# Altium PCB COMECA-PCBv1.PcbDoc
Units mm, origin at the board's own origin, x right, y up, seen from the top; angles counter-clockwise.
Board outline 140 x 140 mm, 2 copper layers (Top Layer, Bottom Layer); 115 components, 87 nets, 444 pads, 10 vias.
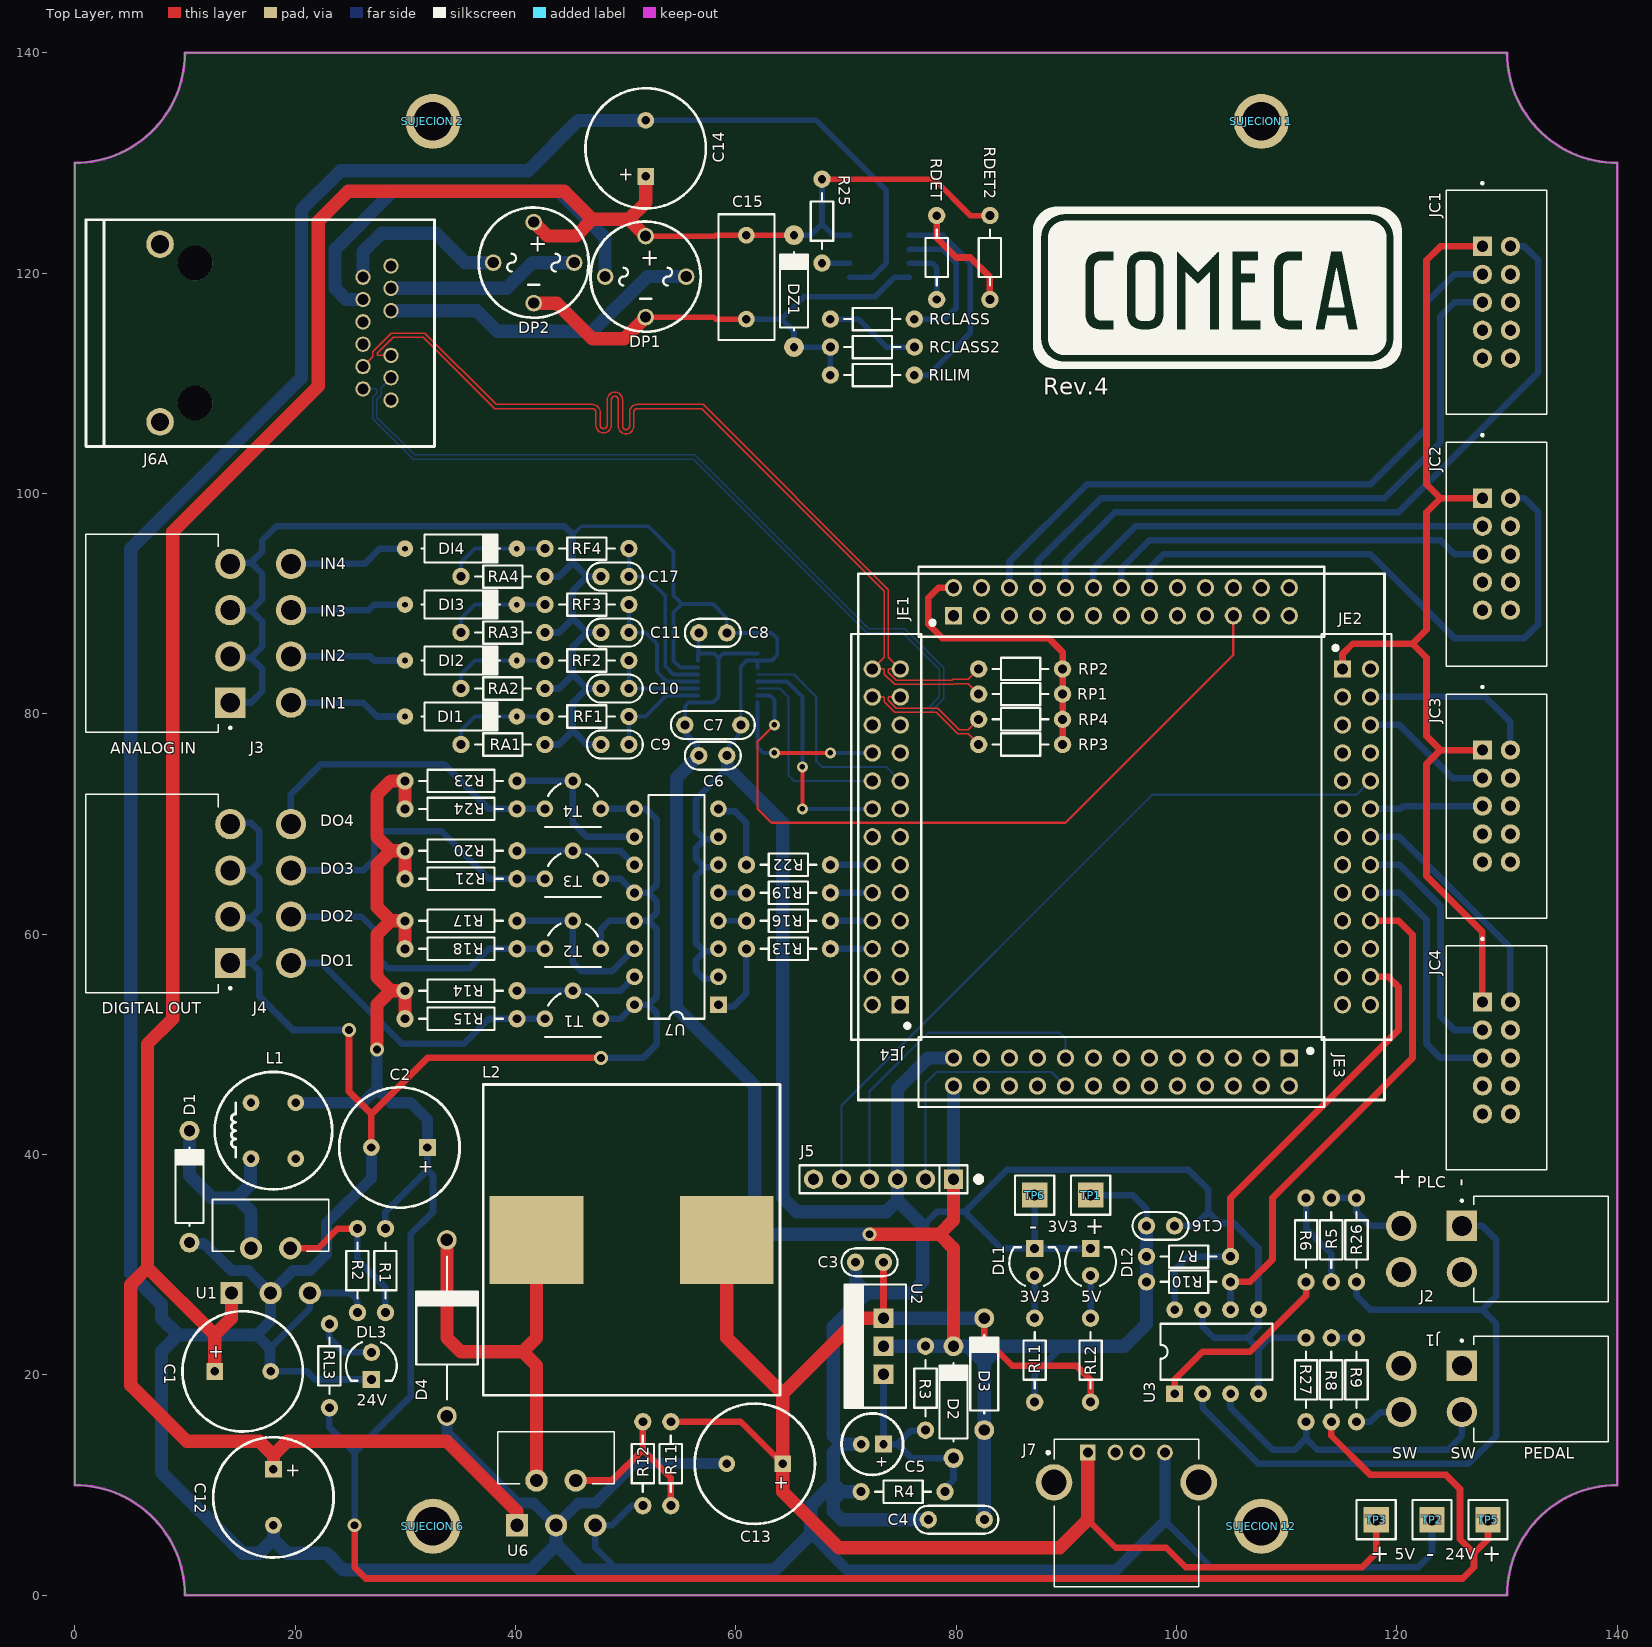
[diagram p0: Top Layer view]
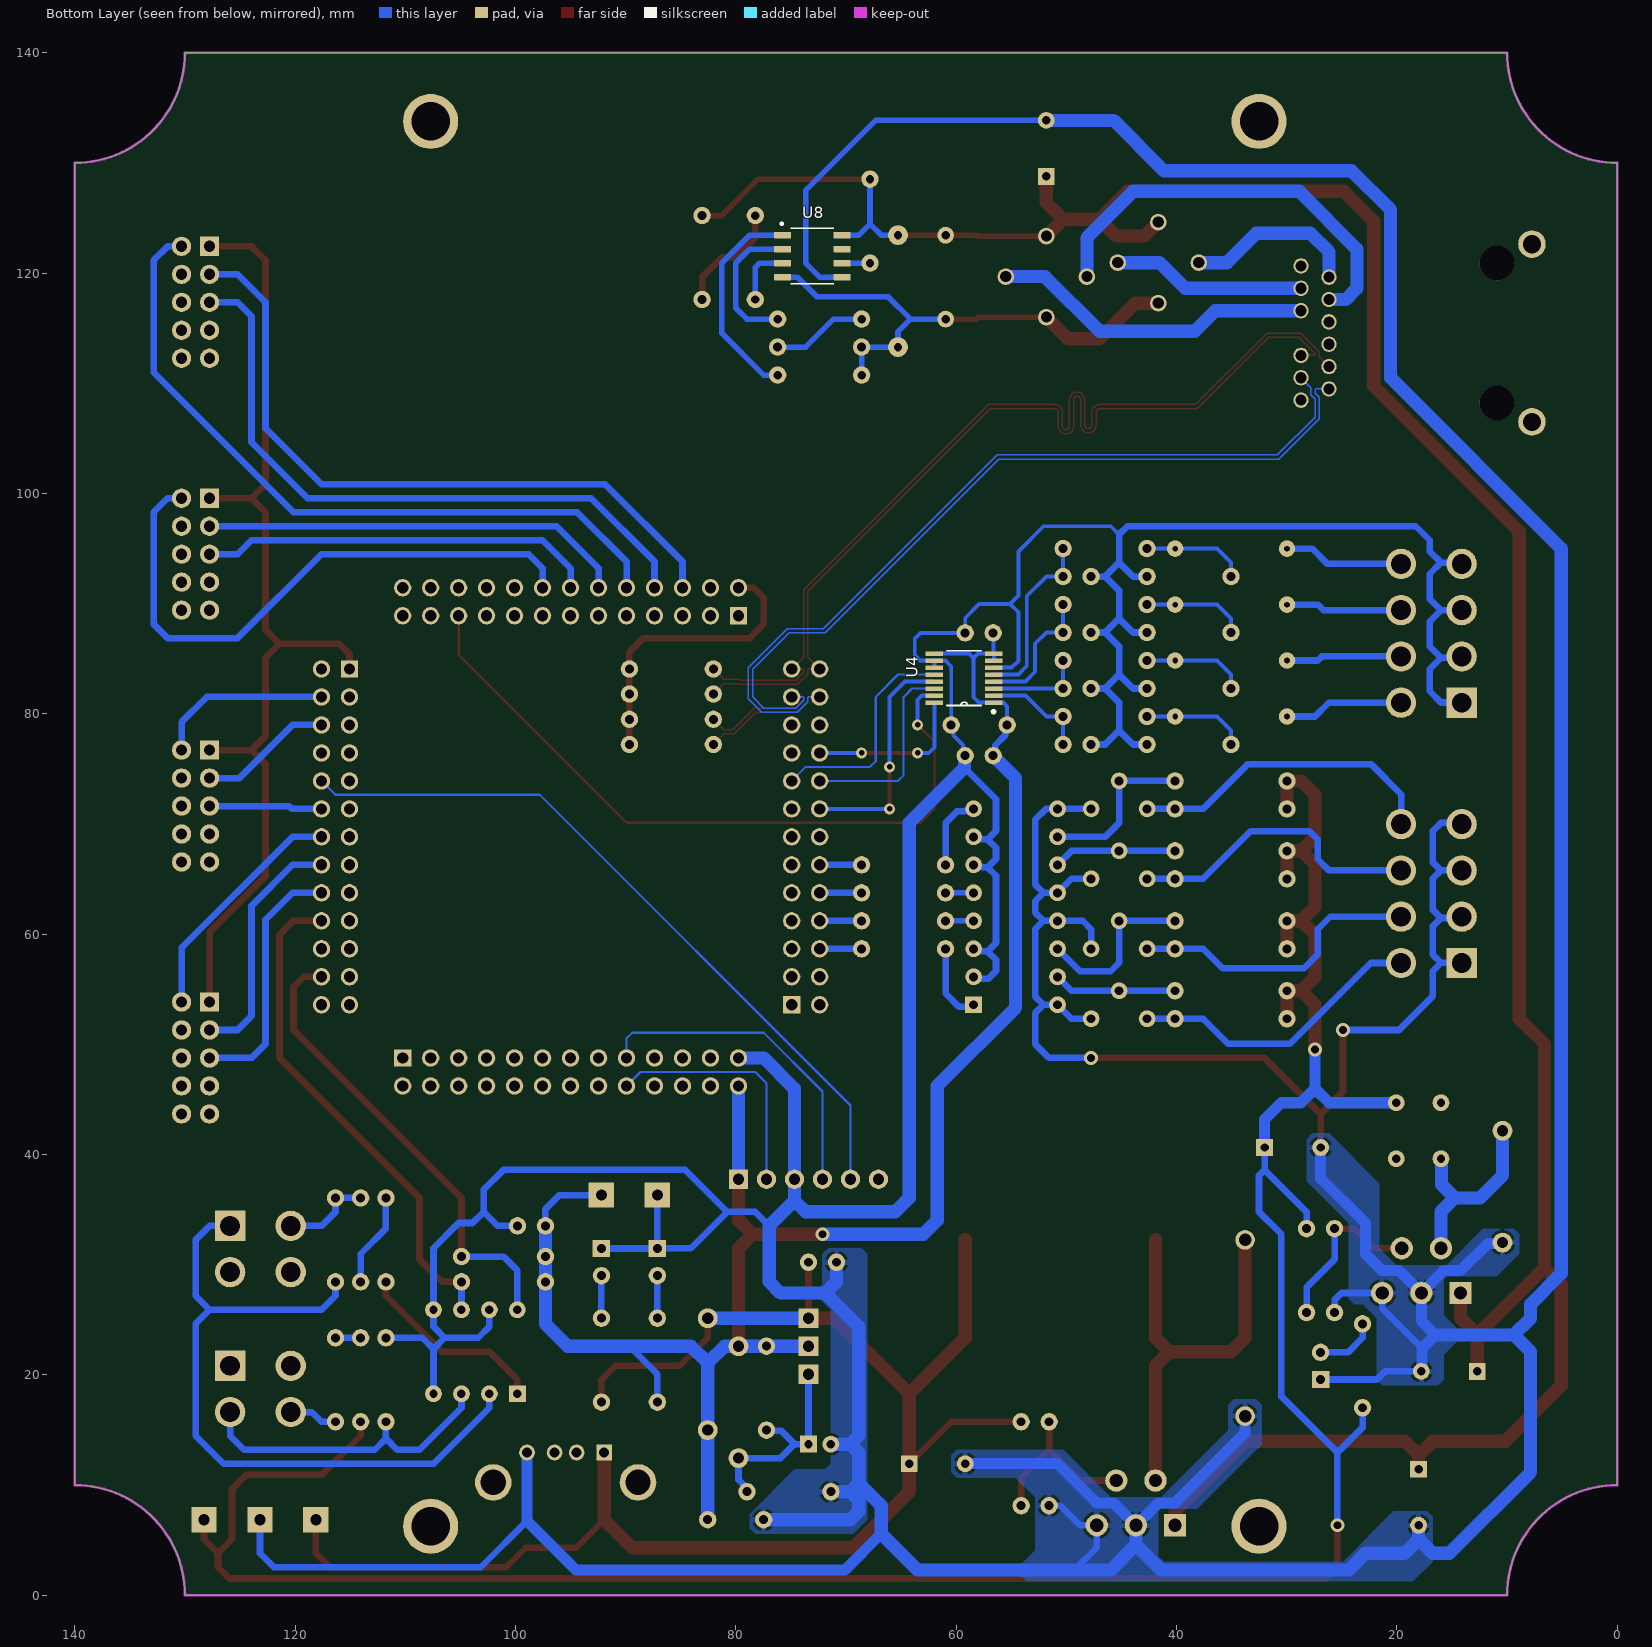
[diagram p1: Bottom Layer view, seen from below]

## Layer stack, top to bottom
Top Solder: solder mask 0.0102, Solder Resist, Dk 3.5
Top Layer: signal copper 0.0356
Dielectric 1: dielectric 0.32, FR-4, Dk 4.8
Bottom Layer: signal copper 0.0356
Bottom Solder: solder mask 0.0102, Solder Resist, Dk 3.5

## Board outline
0,10 0,130 ccw(c0,140) 10,140 130,140 ccw(c140,140) 140,130 140,10 ccw(c140,0) 130,0 10,0 ccw(c0,0)

## Design rules (kind name [scope] priority, off if disabled: settings)
BoardOutlineClearance [All] p1: gap=0.2 ignorepadtopadclearanceinfootprint=FALSE except(0.4: Arc-SplitBarrior Arc-SplitContinuation Track-SplitBarrior Track-SplitContinuation SMDPad-SplitBarrior SMDPad-SplitContinuation THPad-SplitBarrior THPad-SplitContinuation Via-SplitBarrior Via-SplitContinuation Fill-SplitBarrior Fill-SplitContinuation Poly-SplitBarrior Poly-SplitContinuation Region-SplitBarrior Region-SplitContinuation Text-SplitBarrior Text-SplitContinuation)
Clearance Clearance_Poly [InPolygon] p1: gap=0.254 ignorepadtopadclearanceinfootprint=FALSE
Clearance "Clearance Bottom Layer" [OnLayer('Bottom Layer')] p2: gap=0.203 ignorepadtopadclearanceinfootprint=TRUE except(0.254: Arc-Text Track-Text SMDPad-Text THPad-Text Via-Text Fill-Text Poly-Text Region-Text Text-Text)
Clearance "Clearance Top Layer" [OnLayer('Top Layer')] p3: gap=0.203 ignorepadtopadclearanceinfootprint=TRUE except(0.254: Arc-Text Track-Text SMDPad-Text THPad-Text Via-Text Fill-Text Poly-Text Region-Text Text-Text)
Clearance [All] p4: gap=0.2 ignorepadtopadclearanceinfootprint=FALSE except(0.089: Arc-Arc Arc-Track Arc-SMDPad Track-Track Track-SMDPad SMDPad-SMDPad; 0.127: Arc-Via Track-Via SMDPad-Via THPad-Via Via-Via; 0.254: Arc-Text Track-Text SMDPad-Text THPad-Text Via-Text Fill-Text Poly-Text Region-Text Text-Text)
DiffPairsRouting [InDifferentialPairClass('ETH')] p1: maxlimit=0.254 minlimit=0.127 mostfreqgap=0.254 toplayer_minwidth=0.127 toplayer_maxwidth=0.381 toplayer_prefwidth=0.381 bottomlayer_minwidth=0.127 bottomlayer_maxwidth=0.381 bottomlayer_prefwidth=0.381 maxuncoupledlength=12.7
HoleSize [All] p1: absolutevalues=TRUE maxlimit=6.3 minlimit=0.2 maxpercent=80.000 minpercent=20.000
MinimumAnnularRing [All] p1: minimumring=0.13
MinimumSolderMaskSliver [All] p1: minsoldermaskwidth=0.1
PolygonConnect PolygonConnect_1 [All] p1: thpad.connectstyle=Relief thpad.reliefconductorwidth=0.508 thpad.reliefentries=4 thpad.polygonreliefangle="90 Angle" thpad.airgapwidth=0.254 smdpad.connectstyle=Relief smdpad.reliefconductorwidth=0.508 smdpad.reliefentries=4 smdpad.polygonreliefangle="90 Angle" smdpad.airgapwidth=0.254 via.connectstyle=Direct via.reliefconductorwidth=0.508 via.reliefentries=4 via.polygonreliefangle="90 Angle" via.airgapwidth=0.254
RoutingCorners [All] p1: cornerstyle=Round minsetback=2.54 maxsetback=2.54
RoutingVias [All] p1: holewidth=0.5 width=1 viastyle="Through Hole" minholewidth=0.3 minwidth=0.5 maxholewidth=1 maxwidth=2
SilkToSilkClearance [All] p1: silktosilkclearance=0.1
SilkToSolderMaskClearance [IsPad] p1: minsilkscreentomaskgap=0.1 clearancetoexposedcopper=TRUE
SolderMaskExpansion [All] p1: expansion=0.102 istentingtop=FALSE
Width [All] p1: maxlimit=2.54 minlimit=0.127 preferedwidth=0.381
24 further rules are at their usual default settings.

## Classes and differential pairs
differential pair class ETH: RX TX
component class COMECA_Main: "SUJECION 1" "SUJECION 2" "SUJECION 6" "SUJECION 12"
component class U_UnidadDeControl-STM: J5 JE1 JE2 JE3 JE4
component class U_SalidasDigitales: J4 R13 R14 R15 R16 R17 R18 R19 R20 R21 R22 R23 R24 T1 T2 T3 T4 U7
component class U_Fuente24VDC: C1 C2 D1 DL3 L1 R1 R2 RL3 TP5 TP6 U1
component class U_Fuente5VDC: C12 C13 D4 DL2 J7 L2 R11 R12 RL2 TP3 U6
component class U_Fuente3.3VDC: C3 C4 C5 D2 D3 DL1 R3 R4 RL1 TP1 TP2 U2
component class U_EntradasAnalogicas: C6 C7 C8 C9 C10 C11 C17 DI1 DI2 DI3 DI4 J3 RA1 RA2 RA3 RA4 RF1 RF2 RF3 RF4 U4
component class U_ControladorPOE: C14 C15 DP1 DP2 DZ1 J6A R25 RCLASS RCLASS2 RDET RDET2 RILIM RP1 RP2 RP3 RP4 U8
component class U_ComandosExt: C16 J1 J2 R5 R6 R7 R8 R9 R10 R26 R27 U3
component class U_Calibres: JC1 JC2 JC3 JC4
differential pair TX: +TX_P -TX_N
differential pair RX: +RX_P -RX_N

## Components (designator, comment, footprint, x,y, rotation, side; value= is the part's Value field where it differs from the comment)
C1 "100uFx100V" CAP200RP 15.24,20.32 r0 top
C2 "220uFx50V" CAP200RP 29.464,40.64 r180 top
C3 "0.1uF" CAP100 72.136,30.226 r180 top
C4 "1uF" CAP200 80.01,6.858 r180 top
C5 "10uFx25V" CAP100RP 72.39,13.716 r180 top
C6 "0.1uF" CAP100 57.912,76.2 r0 top
C7 "1uF" CAP200 57.912,78.994 r0 top
C8 "0.1uF" CAP100 57.912,87.351 r0 top
C9 "0.1uF" CAP100 49.022,77.216 r180 top
C10 "0.1uF" CAP100 49.022,82.296 r180 top
C11 "0.1uF" CAP100 49.022,87.376 r180 top
C12 "100uFx100V" CAP200RP 18.034,8.89 r270 top
C13 "680uFx25V" CAP200RP 61.722,11.938 r180 top
C14 "100uFx100V" CAP200RP 51.816,131.318 r90 top
C15 "0.1uFx100V" CAP300v2 60.96,123.444 r270 top
C16 "0.1uF" CAP100 98.552,33.528 r0 top
C17 "0.1uF" CAP100 49.022,92.456 r180 top
D1 "MUR110" DO41#1 10.414,37.084 r90 top
D2 "1N4007" DO41#1 79.756,17.526 r90 top
D3 "1N4007" DO41#1 82.55,20.066 r90 top
D4 "MUR410" DO41-EXT 33.782,24.257 r90 top
DI1 "1N4148" DO41#2 35.052,79.756 r0 top
DI2 "1N4148" DO41#2 35.052,84.836 r0 top
DI3 "1N4148" DO41#2 35.052,89.916 r0 top
DI4 "1N4148" DO41#2 35.052,94.996 r0 top
DL1 "3V3" LED3 87.122,30.226 r90 top
DL2 "5V" LED3 92.202,30.226 r90 top
DL3 "24V" LED3 26.924,20.828 r270 top
DP1 "W10M" "PUENTE - W10M" 51.816,123.356 r0 top
DP2 "W10M" "PUENTE - W10M" 41.656,124.626 r0 top
DZ1 "1N4758" DO41#3 65.278,118.364 r90 top
J1 "PEDAL" TE_1586863-4 125.896,20.828 r90 top locked
J2 "PLC" TE_1586863-4 125.896,33.528 r90 top locked
J3 "ANALOG IN" TE_1586863-8 14.122,81.008 r270 top locked
J4 "DIGITAL OUT" TE_1586863-8 14.122,57.386 r270 top locked
J5 "PROGRAMMER" SIP6 79.756,37.758 r180 top
J6A "RJ45" ARJP11C-MB 10.922,114.56 r270 top locked
J7 "USB-TYPE-A" TE_6364372-2 95.448,10.244 r0 top locked
JC1 "CAL_1" "TE_5104338-1 - 90DEG" 127.762,122.428 r90 top locked
JC2 "CAL_2" "TE_5104338-1 - 90DEG" 127.762,99.568 r90 top locked
JC3 "CAL_3" "TE_5104338-1 - 90DEG" 127.762,76.708 r90 top locked
JC4 "CAL_4" "TE_5104338-1 - 90DEG" 127.762,53.848 r90 top locked
JE1 "SIP13" "SIP13*2 - HDR" 79.756,88.9 r0 top locked
JE2 "SIP13" "SIP13*2 - HDR" 115.062,84.074 r270 top locked
JE3 "SIP13" "SIP13*2 - HDR" 110.236,48.768 r180 top locked
JE4 "SIP13" "SIP13*2 - HDR" 74.93,53.594 r90 top locked
L1 "2200uH" CHOKE10.5 18.034,42.164 r90 top
L2 "220uH" CHOKE_PAD 50.546,32.258 r90 top
R1 "24K" RES300#1 28.194,25.654 r90 top
R2 "1K3" RES300#1 25.654,25.654 r90 top
R3 "240" RES300#1 77.216,14.986 r90 top
R4 "390" RES300#1 71.374,9.398 r0 top
R5 "1K" RES300#1 114.046,36.068 r270 top
R6 "150" RES300#1 111.76,36.068 r270 top
R7 "680" RES300#1 104.902,30.734 r180 top
R8 "1K" RES300#1 114.046,15.748 r90 top
R9 "150" RES300#1 116.332,23.368 r270 top
R10 "680" RES300#1 104.902,28.448 r180 top
R11 "4K7" RES300#1 54.102,8.128 r90 top
R12 "1K5" RES300#1 51.562,8.128 r90 top
R13 "220" RES300#1 68.58,58.674 r180 top
R14 "4K7" RES400 40.132,54.864 r180 top
R15 "4K7" RES400 40.132,52.324 r180 top
R16 "220" RES300#1 68.58,61.214 r180 top
R17 "4K7" RES400 40.132,61.214 r180 top
R18 "4K7" RES400 40.132,58.674 r180 top
R19 "220" RES300#1 68.58,63.754 r180 top
R20 "4K7" RES400 40.132,67.564 r180 top
R21 "4K7" RES400 40.132,65.024 r180 top
R22 "220" RES300#1 68.58,66.294 r180 top
R23 "4K7" RES400 40.132,73.914 r180 top
R24 "4K7" RES400 40.132,71.374 r180 top
R25 "100K" RES300#2 67.818,120.904 r90 top
R26 "47K" RES300#1 116.332,28.448 r90 top
R27 "47K" RES300#1 111.76,23.368 r270 top
RA1 "150" RES300#1 42.672,77.216 r180 top
RA2 "150" RES300#1 42.672,82.296 r180 top
RA3 "150" RES300#1 42.672,87.376 r180 top
RA4 "150" RES300#1 42.672,92.456 r180 top
RCLASS "4K3" RES300#2 68.58,115.824 r0 top
RCLASS2 "120" RES300#1 68.58,113.284 r0 top
RDET "24K" RES300#2 78.232,117.602 r90 top
RDET2 "910" RES300#1 83.058,117.602 r90 top
RF1 "3K3" RES300#1 42.672,79.756 r0 top
RF2 "3K3" RES300#1 42.672,84.836 r0 top
RF3 "3K3" RES300#1 42.672,89.916 r0 top
RF4 "3K3" RES300#1 42.672,94.996 r0 top
RILIM "160K" RES300#2 68.58,110.744 r0 top
RL1 "330" RES300#1 87.122,25.146 r270 top
RL2 "680" RES300#1 92.202,25.146 r270 top
RL3 "4K7" RES300#1 23.114,24.638 r270 top
RP1 "50" RES300#1 82.042,81.788 r0 top
RP2 "50" RES300#1 82.042,84.074 r0 top
RP3 "50" RES300#1 82.042,77.216 r0 top
RP4 "50" RES300#1 82.042,79.502 r0 top
"SUJECION 1" "SUJECION" "SUJECION (5.00MM - 3.50MM)" 107.696,133.77 r90 top
"SUJECION 2" "SUJECION" "SUJECION (5.00MM - 3.50MM)" 32.512,133.77 r90 top
"SUJECION 6" "SUJECION" "SUJECION (5.00MM - 3.50MM)" 32.512,6.262 r90 top
"SUJECION 12" "SUJECION" "SUJECION (5.00MM - 3.50MM)" 107.696,6.262 r90 top
T1 "BC338" TO92 45.212,53.594 r180 top
T2 "BC338" TO92 45.212,59.944 r180 top
T3 "BC338" TO92 45.212,66.294 r180 top
T4 "BC338" TO92 45.212,72.644 r180 top
TP1 "3V3" "TPTH - PAD ONLY" 92.202,36.322 r0 top
TP2 "GND" "TPTH - PAD ONLY" 123.19,6.858 r0 top
TP3 "5VDC" "TPTH - PAD ONLY" 118.11,6.858 r0 top
TP5 "24VDC" "TPTH - PAD ONLY" 128.27,6.858 r0 top
TP6 "GND" "TPTH - PAD ONLY" 87.122,36.322 r0 top
U1 "LM2575HV-ADJ" TO220-5 17.78,27.432 r0 top
U2 "LM317" "TO-220 V" 73.406,22.606 r90 top
U3 "TLP521" DIP8 99.822,18.288 r90 top
U4 "ADS7841E/2K5" SOP63P600X175-16N 59.276,83.248 r0 bottom
U6 "LM2576HV-ADJ" TO220-5 43.688,6.35 r0 top
U7 "CNY74-4H" DIP16 58.42,53.594 r180 top
U8 "TPS2375D" SOIC127P599X175-8N 73.058,121.539 r180 bottom

## Footprints (in the part's own frame and the unit in brackets; to place one, negate y for a bottom-side part, rotate by r counter-clockwise, add the part's x,y. Pads: shape width x height; smd on the part's side, far side on the other; paste and mask are expansions set on the pad)
ARJP11C-MB [mm] "Magjack Conector for PoE"
  round 1.4 hole 1.016: 1(5.075,15.24) 2(3.045,15.24) 3(1.015,15.24) 4(-1.015,15.24) 5(-3.045,15.24) 6(-5.075,15.24) 7(6.09,17.78) 8(4.06,17.78) 9(2.03,17.78) 10(-2.03,17.78) 11(-4.06,17.78) 12(-6.09,17.78)
  round 3.15 hole 3.175: PAD(-6.35,0) PAD(6.35,0)
  round 2.5 hole 1.651: SHIELD(-8.065,-3.18) SHIELD(8.065,-3.18)
  silkscreen extent -10.29,-9.91 10.29,21.72, body extent -10.33,-10.9 10.33,21.7, height 15.92
CAP100 [mil]
  round 62 hole 32: 1(-50,0) 2(50,0)
  silkscreen extent -100,-50 100,50, body extent -115,-33 115,34, height 241
CAP100RP [mil] "Body diameter 5mm"
  rect 60x60 hole 30: 1(-40,0)
  round 60 hole 30: 2(40,0)
  silkscreen extent -110,-110 110,110, body extent -99,-99 99,100, height 454
CAP200 [mil]
  round 62 hole 32: 1(-100,0) 2(100,0)
  silkscreen extent -150,-50 150,50, body extent -110,-46 110,44, height 246
CAP200RP [mil] "Body Diameter 10.33mm"
  rect 60x60 hole 30: 1(-100,0)
  round 60 hole 30: 2(100,0)
  silkscreen extent -215,-215 215,215, body extent -197,-197 197,197, height 787
CAP300v2 [mil]
  round 60 hole 30: 1(0,0) 2(300,0)
  silkscreen extent -75,-100 375,100, body extent -75,-100 375,100, height 220
CHOKE10.5 [mil] "Choke Inductor 10.5mm"
  round 60 hole 30: 1(-100,80) 2(100,-80) NC(-100,-80) NC(100,80)
  silkscreen extent -210,-210 210,210, body extent -213,-213 213,213, height 709
CHOKE_PAD [mm] "Choke Inductor SMD"
  rect 8x8.5 smd: 1(0,8.636) 2(0,-8.636)
  silkscreen extent -14.1,-13.46 14.1,13.46, body extent -13.65,-11.55 13.65,11.55, height 20
DIP8 [mil]
  rect 60x60 hole 30: 1(0,0)
  round 60 hole 30: 2(0,-100) 3(0,-200) 4(0,-300) 5(300,-300) 6(300,-200) 7(300,-100) 8(300,0)
  silkscreen extent 50,-350 250,50, body extent -3,-363 303,63, height 177
DIP16 [mil]
  rect 60x60 hole 32: 1(0,0)
  round 60 hole 32: 2(0,-100) 3(0,-200) 4(0,-300) 5(0,-400) 6(0,-500) 7(0,-600) 8(0,-700) 9(300,-700) 10(300,-600) 11(300,-500) 12(300,-400) 13(300,-300) 14(300,-200) 15(300,-100) 16(300,0)
  silkscreen extent 50,-750 250,50, body extent -3,-744 307,44, height 78
DO41#1 [mm]
  round 1.8 hole 1.016: 1(-5.08,0) 2(5.08,0)
  silkscreen extent -3.56,-1.27 3.56,1.27, body extent -5.46,-1.19 5.46,1.37, height 2.03
DO41#2 [mm]
  round 1.5 hole 0.508: 1(-5.08,0) 2(5.08,0)
  silkscreen extent -3.56,-1.27 3.56,1.27, body extent -5.46,-1.19 5.46,1.37, height 2.03
DO41#3 [mm]
  round 1.8 hole 0.762: 1(-5.08,0) 2(5.08,0)
  silkscreen extent -3.56,-1.27 3.56,1.27, body extent -5.46,-1.19 5.46,1.37, height 2.03
DO41-EXT [mil]
  round 70 hole 45: 1(-315,0) 2(315,0)
  silkscreen extent -255,-110 255,110, body extent -332,-110 332,110, height 220
LED3 [mil]
  round 62 hole 32: 1(-48,0)
  rect 62x62 hole 32: 2(49,0)
  silkscreen extent -84,-90 54,90, body extent -65,-64 65,65, height 19
"PUENTE - W10M" [mm]
  round 1.5 hole 1.016: 1(0,0) 2(-3.677,-3.677) 3(0,-7.354) 4(3.677,-3.677)
  silkscreen extent -5,-8.68 5,1.32, body extent -4.82,-8.58 4.99,1.22, height 4.6
RES300#1 [mil]
  round 62 hole 32: 1(0,0) 2(300,0)
  silkscreen extent 50,-40 250,40, body extent -10,-38 310,38, height 79
RES300#2 [mil]
  round 62 hole 30: 1(0,0) 2(300,0)
  silkscreen extent 50,-40 250,40, body extent -10,-38 310,38, height 79
RES400 [mil]
  round 62 hole 32: 1(0,0) 2(400,0)
  silkscreen extent 50,-40 350,40, body extent -12,-45 412,46, height 96
SIP6 [mm]
  rect 1.75x1.75 hole 1.016: 1(0,0)
  round 1.75 hole 1.016: 2(2.54,0) 3(5.08,0) 4(7.62,0) 5(10.16,0) 6(12.7,0)
  silkscreen extent -1.27,-1.27 13.97,1.27, body extent -1.27,-1.3 13.97,1.24, height 8.38
"SIP13*2 - HDR" [mil]
  rect 62x62 hole 40: 1(0,0)
  round 62 hole 40: 2(0,100) 3(100,0) 4(100,100) 5(200,0) 6(200,100) 7(300,0) 8(300,100) 9(400,0) 10(400,100) 11(500,0) 12(500,100) 13(600,0) 14(600,100) 15(700,0) 16(700,100) 17(800,0) 18(800,100) 19(900,0) 20(900,100) 21(1000,0) 22(1000,100) 23(1100,0) 24(1100,100) 25(1200,0) 26(1200,100)
  silkscreen extent -125,-75 1325,175, body extent -60,-47 1260,148, height 335
SOIC127P599X175-8N [mm]
  rrect25% 1.55x0.6 smd mask+0.07: 1(-2.7,1.905) 2(-2.7,0.635) 3(-2.7,-0.635) 4(-2.7,-1.905) 5(2.7,-1.905) 6(2.7,-0.635) 7(2.7,0.635) 8(2.7,1.905)
  silkscreen extent -2.87,-2.52 1.95,3.04, body extent -3,-2.45 3,2.45, height 1.75
SOP63P600X175-16N [mm]
  rect 1.6x0.41 smd mask+0.05: 1(-2.7,2.222) 2(-2.7,1.587) 3(-2.7,0.952) 4(-2.7,0.317) 5(-2.7,-0.318) 6(-2.7,-0.953) 7(-2.7,-1.588) 8(-2.7,-2.223) 9(2.7,-2.223) 10(2.7,-1.588) 11(2.7,-0.953) 12(2.7,-0.318) 13(2.7,0.317) 14(2.7,0.952) 15(2.7,1.587) 16(2.7,2.222)
  silkscreen extent -2.79,-2.49 1.55,3.17, body extent -3,-2.45 3,2.45, height 1.75
"SUJECION (5.00MM - 3.50MM)" [mm]
  round 5 hole 3.5: 1(0,0)
TE_1586863-4 [mm]
  rect 2.75x2.75 hole 1.8: 1(0,0)
  round 2.75 hole 1.8: 2(0,5.5) 3(-4.2,0) 4(-4.2,5.5)
  silkscreen extent -6.9,-13.3 2.7,0.1, body extent -6.8,-14.13 3.3,6, height 11.25
TE_1586863-8 [mm]
  rect 2.75x2.75 hole 1.8: 1(0,0)
  round 2.75 hole 1.8: 2(0,5.5) 3(-4.2,0) 4(-4.2,5.5) 5(-8.4,0) 6(-8.4,5.5) 7(-12.6,0) 8(-12.6,5.5)
  silkscreen extent -15.3,-13.11 2.7,0.1, body extent -15.32,-14 3.18,6.13, height 11.25
"TE_5104338-1 - 90DEG" [mm]
  rect 1.75x1.75 hole 1.016: 1(0,0)
  round 1.75 hole 1.016: 2(0,-2.54) 3(-2.54,0) 4(-2.54,-2.54) 5(-5.08,0) 6(-5.08,-2.54) 7(-7.62,0) 8(-7.62,-2.54) 9(-10.16,0) 10(-10.16,-2.54)
  silkscreen extent -15.24,-5.84 5.83,3.3, body extent -15.24,-12.19 5.08,0.32, height 9.27
TE_6364372-2 [mm]
  rect 1.428x1.428 hole 0.92: 1(-3.5,2.71)
  round 1.428 hole 0.92: 2(-1,2.71) 3(1,2.71) 4(3.5,2.71)
  round 3.316 hole 2.3: SH1(-6.57,0) SH2(6.57,0)
  silkscreen extent -7.2,-9.48 6.57,3.94, body extent -7.26,-10.3 7.37,3.7, height 7.69
TO92 [mil]
  round 60 hole 32: 1(0,-50) 2(100,50) 3(-100,50)
  silkscreen extent -100,-39 100,115, body extent -110,-61 110,110, height 315
TO220-5 [mil]
  rect 79.5x79.5 hole 47.24: 1(-140,0)
  round 79.5 hole 47.24: 2(-70,160) 3(0,0) 4(70,160) 5(140,0)
  silkscreen extent -208,149 208,334, body extent -200,-6 200,327, height 824
"TO-220 V" [mil]
  rect 70x70 hole 40: 1(-100,0) 2(0,0) 3(100,0)
  silkscreen extent -220,-80 220,139, body extent -200,-58 200,107, height 900
"TPTH - PAD ONLY" [mm]
  rect 2.3x2.3 hole 1.016: 1(0,0)
  silkscreen extent -1.78,-1.78 1.78,1.78

## Part data
C1 C2 C5 C12 C13 C14: library part CAPPOL
C3 C4 C6 C7 C8 C9 C10 C11 C15 C16 C17: library part CAP
D1 D4: library part "DIODO SCHOTTKY"
D2 D3 DI1 DI2 DI3 DI4: library part DIODO
DL1 DL2 DL3: library part LED
DP1 DP2: "Bridge Rectifier TH 1000V 1.5A"
DZ1: library part "DIODO ZENER"
J1 J2: library part 1586863-4, "Conn Power HDR 4 POS 4.2mm Solder RA Thru-Hole 4 Terminal 1 Port Tray", Package=None, Availability=Unavailable, EU_RoHS_Compliance=Compliant, MF="TE Connectivity", MP=1586863-4, Price=None, SnapEDA_Link=https://www.snapeda.com/parts/1586863-4/TE%20Connectivity%20AMP%20Connectors/view-part/1401879/?ref=snap, TE_purchase_URL=https://www.te.com/usa-en/product-1586863-4.html?te_bu=Cor&te_type=disp&te_campaign=seda_glo_cor-seda-global-disp-prtnr-fy19-seda-model-bom-cta_sma-317_1&elqCampaignId=32493
J3 J4: library part 1586863-8, "Conn Power HDR 8 POS 4.2mm Solder RA Thru-Hole 8 Terminal 1 Port Tray", Package=None, Availability=Unavailable, EU_RoHS_Compliance=Compliant, MF="TE Connectivity", MP=1586863-8, Price=None, SnapEDA_Link=https://www.snapeda.com/parts/1586863-8/TE%20Connectivity%20AMP%20Connectors/view-part/1404500/?ref=snap, TE_purchase_URL=https://www.te.com/usa-en/product-1586863-8.html?te_bu=Cor&te_type=disp&te_campaign=seda_glo_cor-seda-global-disp-prtnr-fy19-seda-model-bom-cta_sma-317_1&elqCampaignId=32493
J5: library part CON6
J6A: library part ARJP11C-MBSC-L2, "Magjack Connector for PoE"
J7: library part 6364372-2, "Conn USB 2.0 Type A RCP 4 POS Solder RA Thru-Hole 4 Terminal 1 Port Box/Tube", Package=None, Digi-Key_Part_Number=A122647-ND, Digi-Key_Purchase_URL=https://www.digikey.com/product-detail/en/te-connectivity-amp-connectors/6364372-2/A122647-ND/2286712?utm_source=snapeda&utm_medium=aggregator&utm_campaign=symbol, EU_RoHS_Compliance=Compliant, MF="TE Connectivity", MP=6364372-2, SnapEDA_Link=https://www.snapeda.com/parts/6364372-2/TE%20Connectivity%20AMP%20Connectors/view-part/2053020/?ref=snap, TE_purchase_URL=https://www.te.com/usa-en/product-6364372-2.html?te_bu=Cor&te_type=disp&te_campaign=seda_glo_cor-seda-global-disp-prtnr-fy19-seda-model-bom-cta_sma-317_1&elqCampaignId=32493
JC1 JC2 JC3 JC4: library part 5104338-1, "HEADER; PIN; AMP-LATCH; 10 POS; 2.54 X 2.54; VERTICAL; LOW PROFILE; PCB", Package=None, Availability=Unavailable, MF="TE Connectivity", MP=5104338-1, Price=None, SnapEDA_Link=https://www.snapeda.com/parts/5104338-1/TE%20Connectivity%20AMP%20Connectors/view-part/2881080/?ref=snap, TE_purchase_URL=https://www.te.com/usa-en/product-5104338-1.html?te_bu=Cor&te_type=disp&te_campaign=seda_glo_cor-seda-global-disp-prtnr-fy19-seda-model-bom-cta_sma-317_1&elqCampaignId=32493
JE1 JE2 JE3 JE4: library part CON13*2
L1 L2: library part Choke
R1 R2 R3 R4 R5 R6 R7 R8 R9 R10 R11 R12 R13 R14 R15 R16 R17 R18 R19 R20 R21 R22 R23 R24 R25 R26 R27 RA1 RA2 RA3 RA4 RCLASS RCLASS2 RDET RDET2 RF1 RF2 RF3 RF4 RILIM RL1 RL2 RL3 RP1 RP2 RP3 RP4: library part RES
T1 T2 T3 T4: library part "TRANSISTOR NPN"
TP1 TP2 TP3 TP5 TP6: library part TP
U1 U6: library part LM257X, "Buck Switching Regulator IC Positive Output 1A TO-220-5 Formed Leads"
U2: "IC REG ADJ 1.5A 3 TERM TO-220"
U3: library part TLP521-2, "PhotoCoupler"
U4: "ANALOG-TO-DIGITAL CONVERTER", Package=None, Availability=Unavailable, MP=ADS7841E/2K5, Price=None
U8: "Class 3 PoE PD with latch protection 8-SOIC -40 to 85", Package="SOIC-8 Texas Instruments", Check_prices=https://www.snapeda.com/parts/TPS2375D/Texas%20Instruments/view-part/570877/?ref=eda, Digi-Key_Part_Number=296-26922-2-ND, MF="Texas Instruments", MP=TPS2375D, Purchase-URL=https://pricing.snapeda.com/search/part/TPS2375D/?ref=eda, SnapEDA_Link=https://www.snapeda.com/parts/TPS2375D/Texas%20Instruments/view-part/570877/?ref=snap

## Via types
v1: diameter 1.25, hole 0.711, Top Layer to Bottom Layer, tented both sides, 5 vias
v2: diameter 1.016, hole 0.508, Top Layer to Bottom Layer, tented both sides, 5 vias

## Nets (pads, with @x,y where several pads share a name; then routed paths per layer and width w, separated by ;. In a path a pad name is that pad's centre, name@x,y a point inside that pad or via, vN(x,y) a via of type N, cw(c..) or ccw(c..) an arc to the next point about the centre after c; other vN are vias at no path point)
3.3VDC: C4.1 C6.1 C7.1 C8.1 C16.1 D2.2 D3.1 J5.1 JE3.26 R3.2 R7.2 R10.2 RL1.2 TP1.1 U2.2 U4.1 U4.7 U4.8 U4.9 | length 169.8
  Top Layer w1.2: v1(72.136,32.766) 78.466,32.766 ; D2.2 79.756,31.496 78.486,32.766 79.756,34.036 J5.1
  Bottom Layer w0.35: C7.1 55.372,80.678 55.72,81.026 U4.1 57.937,81.026 58.42,81.509 58.42,85.065 ; U4.7 U4.8 58.014,85.471 58.42,85.065 ; U4.8@56.609,85.566 C8.1@56.609,87.318 ; U4.9 58.826,85.471 58.42,85.065
  Bottom Layer w0.6: C7.1 55.559,78.807 55.559,78.045 56.455,77.149 56.455,76.387 C6.1 ; C8.1@56.609,87.318 C8.1 ; RL1.2 87.122,20.066 89.662,22.606 ; TP1.1 96.012,36.322 97.282,35.052 C16.1
  Bottom Layer w1.2: C6.1 54.61,74.168 54.61,53.34 61.722,46.228 61.722,34.036 62.992,32.766 v1(72.136,32.766) ; U2.2 R3.2 D2.2 81.026,22.606 82.55,21.082 ; J5.1@79.756,38.354 JE3.26 ; C4.1 D3.1 82.55,21.082 ; C16.1 R7.2 R10.2 97.282,24.638 95.25,22.606 89.662,22.606 84.074,22.606 82.55,21.082
3.3VDC_ETH: JE1.2 RP1.2 RP2.2 RP3.2 RP4.2 | length 26.7
  Top Layer w0.6: JE1.2 78.398,91.44 77.47,90.512 77.47,88.138 78.74,86.868 88.392,86.868 89.662,85.598 RP2.2 RP1.2 RP4.2 RP3.2
5VDC_OUT: C3.1 C13.1 D3.2 J7.1 L2.2 R11.2 RL2.2 TP3.1 U2.3 | length 146.4
  Top Layer w0.6: R11.2 60.452,15.748 C13.1 ; U2.3 C3.1 ; D3.2 82.55,23.368 85.09,20.828 90.932,20.828 92.202,19.558 RL2.2 ; 91.948,6.858 94.488,4.318 99.06,4.318 100.838,2.54 116.84,2.54 118.11,3.81 TP3.1
  Top Layer w1.2: L2.2 59.182,23.368 64.262,18.288 ; U2.3 71.12,25.146 64.262,18.288 ; J7.1 91.948,6.858 89.408,4.318 87.122,4.318 69.342,4.318 64.262,9.398 C13.1 64.262,18.288
  Bottom Layer w1.2: U2.3 D3.2
24VDC: C2.1 L1.2 R1.2 R8.1 R14.2 R15.2 R17.2 R18.2 R20.2 R21.2 R23.2 R24.2 RL3.2 TP5.1 | length 244.8
  Top Layer w0.6: v1(25.4,6.35) 25.4,2.54 26.416,1.524 125.984,1.524 127,2.54 127,3.81 ; R8.1 114.046,14.478 117.602,10.922 124.46,10.922 125.73,9.652 125.73,5.08 127,3.81 ; TP5.1 128.27,5.08 127,3.81
  Top Layer w1.2: v1(27.432,49.53) 27.432,53.594 28.702,54.864 ; R15.2 R14.2 28.702,54.864 ; R18.2 R17.2 28.702,61.214 ; R21.2 R20.2 28.702,67.564 ; R24.2 R23.2 28.702,73.914 27.432,72.644 27.432,68.834 28.702,67.564 ; 28.702,54.864 27.432,56.134 27.432,59.944 28.702,61.214 ; 28.702,61.214 27.432,62.484 27.432,66.294 28.702,67.564
  Bottom Layer w0.6: RL3.2 23.114,15.24 25.4,12.954 ; v1(25.4,6.35) 25.4,12.954 ; R1.2 28.194,34.798 32.004,38.608 ; C2.1 32.004,38.608 ; 25.4,12.954 30.48,18.034 30.48,32.766 32.512,34.798 32.512,38.1 32.004,38.608
  Bottom Layer w1.016: L1.2 26.162,44.704 27.432,45.974 ; v1(27.432,49.53) 27.432,45.974 ; C2.1 32.004,43.18 30.48,44.704 28.702,44.704 27.432,45.974
AN1: DI1.1 J3.2 | length 10.9
  Bottom Layer w0.6: J3.2 26.18,81.008 27.432,79.756 DI1.1
AN2: DI2.1 J3.4 | length 10.5
  Bottom Layer w0.6: J3.4 26.806,85.208 27.178,84.836 DI2.1
AN3: DI3.1 J3.6 | length 10.6
  Bottom Layer w0.6: J3.6 26.67,89.408 27.178,89.916 DI3.1
AN4: DI4.1 J3.8 | length 10.9
  Bottom Layer w0.6: J3.8 26.298,93.608 27.686,94.996 DI4.1
ANALOG_GND_A: C1.2 C2.2 C3.2 C4.2 C5.2 C6.2 C7.2 C8.2 C9.2 C10.2 C11.2 C12.2 C13.2 C14.2 C16.2 C17.2 D1.1 D4.1 DL1.2 DL2.2 DL3.2 J3.1 J3.3 J3.5 J3.7 J4.1 J4.3 J4.5 J4.7 J5.3 J7.4 JE3.25 R2.1 R4.1 R12.1 R27.1 RA1.1 RA2.1 RA3.1 RA4.1 T1.3 T2.3 T3.3 T4.3 TP2.1 TP6.1 U1.3 U1.5 U3.4 U3.5 U3.7 U4.6 U4.10 U4.11 U6.3 U6.5 U7.2 U7.3 U7.6 U7.7 U7.9 U7.12 U7.13 U7.16 U8.5 | length 940.2
  Top Layer w0.6: v1(24.892,51.308) 24.892,45.72 26.924,43.688 ; C2.2 26.924,43.688 ; v1(47.752,48.768) 32.004,48.768 26.924,43.688
  Bottom Layer w0.35: 45.212,96.266 45.974,97.028 52.07,97.028 54.356,94.742 54.356,90.741 55.118,89.979 ; U4.6 54.966,84.201 54.356,84.811 54.356,89.217 55.118,89.979 ; C6.2 59.379,76.397 59.379,77.159 60.255,78.035 60.255,78.797 C7.2 60.452,84.303 60.985,84.836 U4.10 ; U4.11 U4.10 ; 55.118,89.979 57.912,89.979 59.182,88.709 C8.2 63.246,87.351 63.754,86.843 63.754,85.319 63.271,84.836 U4.10
  Bottom Layer w0.508: C14.2 67.31,133.858 73.66,127.508 73.66,120.904 72.39,119.634 U8.5
  Bottom Layer w0.6: J4.1 14.14,57.404 16.002,57.404 ; J4.3 14.24,61.468 16.002,61.468 ; J4.5 16.002,65.786 ; J4.7 14.24,70.104 16.002,70.104 16.764,69.342 16.764,66.548 16.002,65.786 ; J3.1 14.14,81.026 16.002,81.026 17.018,82.042 17.018,84.074 16.002,85.09 ; J3.3 14.24,85.09 16.002,85.09 ; J3.5 16.002,89.408 ; J3.7 14.24,93.726 16.002,93.726 ; 17.718,22.414 21.336,26.032 U1.5 25.019,27.432 25.654,26.797 R2.1 ; C1.2 21.082,20.32 21.819,19.583 DL3.2 ; v1(24.892,51.308) 19.812,51.308 16.764,54.356 16.764,56.642 16.002,57.404 ; RA1.1 43.942,77.216 45.212,78.486 ; RA2.1 43.942,82.296 45.212,83.566 ; RA3.1 43.942,87.376 45.212,88.646 ; RA4.1 43.942,92.456 45.212,93.726 ; v1(47.752,48.768) 51.562,48.768 52.832,50.038 52.832,52.832 52.07,53.594 ; T1.3 49.53,52.324 U7.16 52.07,53.594 ; T2.3 47.752,60.452 48.514,61.214 U7.13 52.07,61.214 ; T3.3 49.53,65.024 U7.12 52.07,63.754 ; T4.3 U7.9 51.837,71.374 52.832,70.379 52.832,64.516 52.07,63.754 ; C9.2 46.482,77.216 45.212,78.486 ; C10.2 46.482,82.296 ; C11.2 46.482,87.376 ; C17.2 46.482,92.456 ; 49.276,2.286 47.244,4.318 U6.5 48.768,6.35 50.546,8.128 R12.1 ; U7.2 58.243,55.957 57.622,55.957 57.607,55.942 57.109,55.942 56.388,56.663 56.388,57.679 57.15,58.441 ; U7.3 58.243,58.497 57.663,58.497 57.607,58.441 57.15,58.441 ; U7.6 58.243,66.117 57.663,66.117 57.607,66.061 57.15,66.061 ; U7.7 58.243,68.657 57.663,68.657 57.607,68.601 57.15,68.601 ; 59.254,75.112 56.388,72.247 56.388,69.363 57.15,68.601 ; 76.962,33.528 78.232,34.798 80.772,34.798 ; DL1.2@87.099,31.496 84.074,31.496 80.772,34.798 ; TP6.1 DL1.2 DL2.2 ; 98.948,6.746 103.154,2.54 121.92,2.54 123.19,3.81 TP2.1 ; C16.2 101.6,33.528 102.87,34.798 ; U3.7 102.362,24.384 103.378,23.368 106.426,23.368 ; U3.4 107.442,22.352 ; R27.1 108.458,23.368 107.442,22.352 ; 16.002,57.404 16.764,58.166 16.764,60.706 16.002,61.468 ; 16.002,61.468 16.764,62.23 16.764,65.024 16.002,65.786 ; 16.002,85.09 17.018,86.106 17.018,88.392 16.002,89.408 ; 16.002,89.408 17.018,90.424 17.018,92.71 16.002,93.726 ; 16.002,93.726 17.018,94.742 17.018,95.758 18.288,97.028 44.45,97.028 45.212,96.266 45.212,93.726 ; 45.212,78.486 45.212,81.026 46.482,82.296 ; 45.212,83.566 46.482,82.296 ; 45.212,83.566 45.212,86.106 46.482,87.376 ; 45.212,88.646 46.482,87.376 ; 45.212,88.646 45.212,91.186 46.482,92.456 ; 45.212,93.726 46.482,92.456 ; 52.07,53.594 52.832,54.356 52.832,60.452 52.07,61.214 ; 52.07,61.214 52.832,61.976 52.832,62.992 52.07,63.754 ; 57.15,58.441 56.388,59.203 56.388,65.299 57.15,66.061 ; 57.15,66.061 56.388,66.823 56.388,67.839 57.15,68.601 ; 80.772,34.798 84.582,38.608 101.092,38.608 102.87,36.83 102.87,34.798 ; 102.87,34.798 103.886,33.782 105.156,33.782 107.442,31.496 U3.5 107.442,24.384 106.426,23.368 ; 106.426,23.368 107.442,22.352
  Bottom Layer w1: D1.1 10.476,31.942 11.746,31.942 14.224,29.464 15.748,29.464 U1.3 ; C1.2@17.718,20.382 17.718,22.414 16.51,23.622 17.78,24.892 U1.3 ; C2.2 26.924,37.846 22.86,33.782 22.86,30.988 21.336,29.464 19.812,29.464 U1.3 ; D4.1 33.782,14.732 40.132,8.382 41.656,8.382 U6.3 45.72,8.382 47.244,8.382 50.8,11.938 C13.2 ; 66.802,5.588 70.104,2.286 94.488,2.286 98.948,6.746 J7.4
  Bottom Layer w1.2: 16.51,23.622 9.398,23.622 ; C1.2@17.718,20.382 C1.2 ; C12.2 18.034,5.08 ; U6.3 43.688,4.572 ; C14.2 45.72,133.858 41.148,129.286 24.13,129.286 20.574,125.73 20.574,110.49 5.08,94.996 5.08,29.21 7.874,26.416 7.874,25.146 9.398,23.622 ; C6.2 59.254,76.128 59.254,75.112 64.262,70.104 64.262,36.068 65.532,34.798 73.66,34.798 74.676,35.814 ; C3.2 70.866,28.448 71.882,27.432 ; R4.1 69.596,9.398 ; C5.2 69.596,13.716 ; J5.3 74.676,35.814 ; J5.3@74.676,38.354 74.676,45.974 77.47,48.768 JE3.25 ; C4.2 69.596,6.858 68.834,7.62 68.834,8.636 69.596,9.398 ; 9.398,23.622 7.874,22.098 7.874,11.176 15.24,3.81 16.764,3.81 18.034,5.08 ; 18.034,5.08 19.304,3.81 22.86,3.81 24.384,2.286 41.402,2.286 43.688,4.572 ; 43.688,4.572 45.974,2.286 49.276,2.286 63.5,2.286 66.802,5.588 66.802,8.128 68.834,10.16 ; 68.834,10.16 68.834,12.954 69.596,13.716 ; 68.834,10.16 69.596,9.398 ; 69.596,13.716 68.834,14.478 68.834,24.384 71.882,27.432 ; 71.882,27.432 75.946,27.432 76.962,28.448 76.962,33.528 74.676,35.814
BUSY_A: JE4.16 U4.13 | length 21.2
  Top Layer w0.35: v2(66.04,71.374) v2(66.04,75.184)
  Bottom Layer w0.35: U4.13 64.643,82.931 66.04,81.534 v2(66.04,75.184) ; v2(66.04,71.374) JE4.16
CS_A: JE1.21 U4.15 | length 65.8
  Top Layer w0.203: v2(63.5,78.994) 61.976,77.47 61.976,71.374 63.246,70.104 89.916,70.104 105.156,85.344 JE1.21
  Bottom Layer w0.35: U4.15 63.119,81.661 63.5,81.28 v2(63.5,78.994)
DCLK_A: JE4.20 U4.16 | length 14.7
  Top Layer w0.35: v2(63.5,76.454) v2(68.58,76.454)
  Bottom Layer w0.35: U4.16 61.976,76.962 62.484,76.454 v2(63.5,76.454) ; v2(68.58,76.454) JE4.20
DIG_OUT1: J4.2 R15.1 T1.2 | length 27
  Bottom Layer w0.6: J4.2 22.37,57.386 29.718,50.038 35.306,50.038 37.592,52.324 R15.1 T1.2
DIG_OUT2: J4.4 R18.1 T2.2 | length 27.1
  Bottom Layer w0.6: J4.4 26.044,61.586 27.178,60.452 27.178,58.166 28.448,56.896 35.814,56.896 37.592,58.674 R18.1 T2.2
DIG_OUT3: J4.6 R21.1 T3.2 | length 27.4
  Bottom Layer w0.6: J4.6 26.162,65.786 27.178,66.802 27.178,68.58 27.94,69.342 33.274,69.342 37.592,65.024 R21.1 T3.2
DIG_OUT4: J4.8 R24.1 T4.2 | length 28.6
  Bottom Layer w0.6: J4.8 19.622,72.708 22.352,75.438 33.528,75.438 37.592,71.374 R24.1 T4.2
DIN_A: JE4.18 U4.14 | length 18.1
  Bottom Layer w0.203: U4.14 64.008,82.296 64.77,81.534 64.77,74.422 65.278,73.914 JE4.18
DOUT_A: JE4.17 U4.12 | length 20.4
  Bottom Layer w0.203: U4.12 65.278,83.566 67.31,81.534 67.31,75.692 67.818,75.184 73.66,75.184 JE4.17
GND2: JC1.1 JC2.1 JC3.1 JC4.1 JE2.1 | length 93.9
  Top Layer w0.6: JE2.1 115.062,85.432 115.99,86.36 121.412,86.36 ; JC4.1 127.762,60.198 122.682,65.278 122.682,75.438 123.952,76.708 ; JC3.1 123.952,76.708 ; JC2.1 123.952,99.568 ; JC1.1 123.952,122.428 122.682,121.158 122.682,100.838 123.952,99.568 ; 121.412,86.36 122.682,85.09 122.682,77.978 123.952,76.708 ; 121.412,86.36 122.682,87.63 122.682,98.298 123.952,99.568
NetC5_1: C5.1 D2.1 R3.1 R4.2 U2.1 | length 19.7
  Bottom Layer w0.35: R4.2 R4.2@78.994,9.729
  Bottom Layer w0.6: U2.1 C5.1 74.676,13.716 ; R3.1 77.174,14.944 75.904,14.944 74.676,13.716 ; R4.2@78.994,9.729 79.756,10.491 D2.1 75.946,12.446 74.676,13.716
NetD1_2: D1.2 L1.1 U1.2 | length 18.4
  Bottom Layer w1.2: D1.2 10.414,38.1 12.446,36.068 14.736,36.068 ; U1.2 16.002,34.802 14.736,36.068 ; L1.1 15.94,39.562 15.94,37.272 14.736,36.068
NetD4_2: D4.2 L2.1 U6.2 | length 39.2
  Top Layer w1.2: D4.2 33.782,23.368 35.052,22.098 40.64,22.098 ; U6.2 41.91,20.828 40.64,22.098 ; L2.1 41.91,23.368 40.64,22.098
NetDI1_2: DI1.2 RA1.2 RF1.1 | length 9.4
  Bottom Layer w0.35: RA1.2 35.052,78.486 36.322,79.756 DI1.2 RF1.1
NetDI2_2: DI2.2 RA2.2 RF2.1 | length 9.4
  Bottom Layer w0.35: RA2.2 35.052,83.566 36.322,84.836 DI2.2 RF2.1
NetDI3_2: DI3.2 RA3.2 RF3.1 | length 9.4
  Bottom Layer w0.35: RA3.2 35.052,88.646 36.322,89.916 DI3.2 RF3.1
NetDI4_2: DI4.2 RA4.2 RF4.1 | length 9.4
  Bottom Layer w0.35: RA4.2 35.052,93.726 36.322,94.996 DI4.2 RF4.1
NetDL1_1: DL1.1 RL1.1 | length 3.9
  Bottom Layer w0.6: RL1.1 DL1.1
NetDL2_1: DL2.1 RL2.1 | length 3.9
  Bottom Layer w0.6: RL2.1 DL2.1
NetDL3_1: DL3.1 RL3.1 | length 5.6
  Bottom Layer w0.6: RL3.1 23.114,23.368 24.435,22.047 DL3.1
NetJ1_3: J1.3 R27.2 U3.3 | length 28.9
  Bottom Layer w0.6: U3.3 104.902,17.018 108.712,13.208 110.744,13.208 111.76,14.224 ; R27.2 111.76,14.224 ; J1.3 125.896,14.478 124.626,13.208 112.776,13.208 111.76,14.224
NetJ1_4: J1.4 R9.2 | length 4.4
  Bottom Layer w0.6: R9.2 117.602,15.748 118.472,16.618 120.386,16.618 J1.4
NetJ2_2: J2.2 R5.1 R26.2 | length 8.1
  Bottom Layer w0.6: R5.1 R26.2 116.332,34.798 117.602,33.528 J2.2
NetR1_1: R1.1 R2.2 U1.4 | length 15.5
  Top Layer w0.6: U1.4 22.098,31.496 23.876,33.274 R2.2
  Bottom Layer w0.6: R2.2 25.654,30.48 28.194,27.94 R1.1
NetR5_2: R5.2 R6.1 | length 8.6
  Bottom Layer w0.6: R6.1 111.76,33.274 114.046,30.988 R5.2
NetR6_2: R6.2 U3.1 | length 17.6
  Top Layer w0.6: U3.1 99.822,19.558 102.362,22.098 106.68,22.098 111.76,27.178 R6.2
NetR8_2: R8.2 R9.1 | length 2.3
  Bottom Layer w0.6: R8.2 R9.1
NetR11_1: R11.1 R12.2 U6.4 | length 15.9
  Top Layer w0.6: U6.4 48.768,10.414 51.562,13.208 ; R12.2 51.562,13.208 ; R11.1 54.102,10.668 51.562,13.208
NetR13_2: R13.2 U7.1 | length 7.3
  Bottom Layer w0.6: U7.1 58.612,53.402 59.731,53.402 60.96,54.631 R13.2@60.96,58.84
NetR14_1: R14.1 T1.1 U7.15 | length 11.2
  Bottom Layer w0.6: R14.1 T1.1 49.53,54.864 U7.15
NetR16_2: R16.2 U7.4 | length 2.5
  Bottom Layer w0.508: U7.4 R16.2
NetR17_1: R17.1 T2.1 U7.14 | length 15.6
  Bottom Layer w0.6: R17.1 T2.1 45.212,57.404 45.974,56.642 48.768,56.642 U7.14
NetR19_2: R19.2 U7.5 | length 2.5
  Bottom Layer w0.508: U7.5 R19.2
NetR20_1: R20.1 T3.1 U7.11 | length 11.2
  Bottom Layer w0.6: R20.1 T3.1 49.53,67.564 U7.11
NetR22_2: R22.2 U7.8 | length 6.9
  Bottom Layer w0.6: U7.8 58.597,71.197 59.177,71.197 59.233,71.141 59.923,71.141 60.96,70.104 R22.2
NetR23_1: R23.1 T4.1 U7.10 | length 15
  Bottom Layer w0.6: R23.1 T4.1 45.212,70.104 46.482,68.834 U7.10
NetR25_1: R25.1 U8.6 | length 2.5
  Bottom Layer w0.508: R25.1 U8.6
NetRCLASS2_2: RCLASS2.2 RCLASS.1 | length 8.7
  Bottom Layer w0.508: RCLASS.1 71.12,115.824 73.66,113.284 RCLASS2.2
NetRCLASS_2: RCLASS.2 U8.2 | length 13.1
  Bottom Layer w0.508: U8.2 78.74,122.174 80.01,120.904 80.01,116.84 78.994,115.824 RCLASS.2
NetRDET2_1: RDET2.1 RDET.2 | length 10.4
  Top Layer w0.6: RDET.2 78.232,123.19 80.01,121.412 81.28,121.412 83.058,119.634 RDET2.1
NetRDET_1: RDET.1 U8.3 | length 5.5
  Bottom Layer w0.508: U8.3 77.838,120.904 78.232,120.51 RDET.1
NetRILIM_2: RILIM.2 U8.1 | length 19.6
  Bottom Layer w0.508: U8.1 78.74,123.444 81.28,120.904 81.28,114.554 77.47,110.744 RILIM.2
PA0: JC3.2 JE2.4 | length 16.2
  Bottom Layer w0.6: JE2.4 128.016,81.534 130.302,79.248 JC3.2
PA13: J5.4 JE3.17 | length 29.3
  Bottom Layer w0.203: J5.4@72.136,38.354 72.136,45.72 77.47,51.054 89.408,51.054 89.916,50.546 JE3.17
PA14: J5.2 JE3.18 | length 21.8
  Bottom Layer w0.203: J5.2@77.216,38.354 77.216,46.482 78.232,47.498 88.646,47.498 JE3.18
PB1: JC2.2 JE1.16 | length 54.5
  Bottom Layer w0.6: JE1.16 97.536,93.218 98.806,94.488 117.602,94.488 125.222,86.868 131.572,86.868 132.842,88.138 132.842,98.298 131.572,99.568 JC2.2
PB6: JE2.24 R7.1 U3.8 | length 42.9
  Top Layer w0.6: R7.1 104.902,36.068 120.142,51.308 120.142,55.206 119.214,56.134 JE2.24
  Bottom Layer w0.6: U3.8 99.822,29.464 101.092,30.734 R7.1
PB8: JE2.20 R10.1 U3.6 | length 46.3
  Top Layer w0.6: R10.1 106.68,28.448 108.712,30.48 108.712,36.068 121.412,48.768 121.412,59.944 120.142,61.214 JE2.20
  Bottom Layer w0.6: U3.6 R10.1
PC3: JC3.3 JE2.6 | length 12.2
  Bottom Layer w0.6: JE2.6 120.23,78.994 125.056,74.168 JC3.3
PC7: JE4.8 R16.1 | length 3.8
  Bottom Layer w0.6: R16.1 JE4.8
PC9: JE4.6 R13.1 | length 3.8
  Bottom Layer w0.6: R13.1 JE4.6
PD13: JE4.12 R22.1 | length 3.8
  Bottom Layer w0.6: R22.1 JE4.12
PD15: JE4.10 R19.1 | length 3.8
  Bottom Layer w0.6: R19.1 JE4.10
PE0: JC4.5 JE2.18 | length 23
  Bottom Layer w0.6: JE2.18 120.23,63.754 122.682,61.302 122.682,50.038 123.952,48.768 JC4.5
PE2: JC4.3 JE2.16 | length 22.2
  Bottom Layer w0.6: JE2.16 120.23,66.294 123.952,62.572 123.952,52.578 125.222,51.308 JC4.3
PE4: JC4.2 JE2.14 | length 21.8
  Bottom Layer w0.6: JE2.14 120.23,68.834 130.302,58.762 JC4.2
PE6: JC3.5 JE2.12 | length 10.3
  Bottom Layer w0.6: JE2.12 120.308,71.374 120.562,71.628 JC3.5
PE7: JC2.5 JE1.14 | length 36.1
  Bottom Layer w0.6: JE1.14 94.996,93.218 97.536,95.758 123.952,95.758 125.222,94.488 JC2.5
PE9: JC2.3 JE1.12 | length 38.7
  Bottom Layer w0.6: JE1.12 92.456,93.218 96.266,97.028 JC2.3
PE11: JC1.2 JE1.10 | length 65.6
  Bottom Layer w0.6: JE1.10 89.916,93.814 94.4,98.298 120.142,98.298 132.842,110.998 132.842,121.158 131.572,122.428 JC1.2
PE13: JC1.5 JE1.8 | length 59.2
  Bottom Layer w0.6: JE1.8 87.376,93.814 93.13,99.568 118.872,99.568 123.952,104.648 123.952,116.078 125.222,117.348 JC1.5
PE15: JC1.3 JE1.6 | length 62.8
  Bottom Layer w0.6: JE1.6 84.836,93.814 91.86,100.838 117.602,100.838 122.682,105.918 122.682,117.348 125.222,119.888 JC1.3
PLC_GND: J2.1 R26.1 U3.2 | length 66.8
  Bottom Layer w0.6: U3.2 102.362,17.018 107.442,11.938 126.492,11.938 129.032,14.478 129.032,24.638 127.762,25.908 ; R26.1 116.332,27.178 117.602,25.908 127.762,25.908 ; J2.1 127.762,33.528 129.032,32.258 129.032,27.178 127.762,25.908
RA1: C9.1 RF1.2 U4.2 | length 9.6
  Bottom Layer w0.35: C9.1 RF1.2 51.816,79.756 53.721,81.661 U4.2
RA2: C10.1 RF2.2 U4.3 | length 8.8
  Bottom Layer w0.35: RF2.2 C10.1 U4.3
RA3: C11.1 RF3.2 U4.4 | length 12.2
  Bottom Layer w0.35: RF3.2 C11.1 51.816,87.376 52.832,86.36 52.832,83.82 53.721,82.931 U4.4
RA4: C17.1 RF4.2 U4.5 | length 16.2
  Bottom Layer w0.35: RF4.2 C17.1 51.816,92.456 53.594,90.678 53.594,84.328 54.356,83.566 U4.5
RST: J5.5 JE2.10 | length 66.3
  Bottom Layer w0.203: J5.5@69.596,38.354 69.596,44.45 97.79,72.644 116.332,72.644 JE2.10
RX_N: J6A.8 JE4.24 RP3.1 | length 87.2
  Top Layer w0.127: JE4.24 73.395,81.534 73.469,81.46 73.469,81.073 74.405,80.137 78.169,80.137 80.138,78.169 81.09,78.169 RP3.1
  Bottom Layer w0.127: J6A.8 27.808,109.606 27.808,108.943 27.432,108.567 27.432,106.934 30.861,103.505 56.292,103.505 72.055,87.742 75.326,87.742 78.867,84.201 78.867,81.376 77.628,80.137 74.405,80.137 73.469,81.073 73.469,81.46 73.395,81.534 JE4.24
RX_P: J6A.1 JE4.23 RP4.1 | length 85.2
  Top Layer w0.127: JE4.23 73.925,81.534 73.85,81.46 73.85,81.231 74.563,80.518 78.327,80.518 80.296,78.55 81.09,78.55 RP4.1
  Bottom Layer w0.127: J6A.1 27.352,109.485 27.427,109.411 27.427,109.101 27.051,108.725 27.051,106.776 30.703,103.124 56.134,103.124 71.897,87.361 75.169,87.361 78.486,84.043 78.486,81.534 77.47,80.518 74.563,80.518 73.85,81.231 73.85,81.46 73.925,81.534 JE4.23
TX_N: J6A.9 JE4.26 RP1.1 | length 85.4
  Top Layer w0.127: J6A.9 27.512,112.53 27.437,112.604 27.437,112.71 28.901,114.173 31.623,114.173 38.1,107.696 44.944,107.696 46.99,107.696 cw(c46.99,107.379) 47.307,107.379 47.307,106.204 ccw(c48.006,106.204) 48.704,106.204 48.704,108.497 cw(c49.022,108.497) 49.339,108.497 49.339,106.108 ccw(c50.038,106.108) 50.736,106.108 50.736,107.379 cw(c51.054,107.379) 51.054,107.696 51.308,107.696 56.896,107.696 73.469,91.123 73.469,85.154 JE4.26 73.395,84.074 73.469,84 73.469,83.613 74.405,82.677 79.788,82.677 79.851,82.741 81.09,82.741 RP1.1
TX_P: J6A.2 JE4.25 RP2.1 | length 86.2
  Top Layer w0.127: J6A.2 27.056,112.409 27.056,112.867 28.743,114.554 31.781,114.554 38.258,108.077 44.944,108.077 46.99,108.077 cw(c46.99,107.379) 47.688,107.379 47.688,106.204 ccw(c48.006,106.204) 48.323,106.204 48.323,108.497 cw(c49.022,108.497) 49.72,108.497 49.72,106.108 ccw(c50.038,106.108) 50.355,106.108 50.355,107.379 cw(c51.054,107.379) 51.054,108.077 51.308,108.077 57.054,108.077 73.85,91.28 73.85,85.154 JE4.25 73.925,84.074 73.85,84 73.85,83.771 74.563,83.058 79.63,83.058 79.693,83.122 81.09,83.122 RP2.1
VC1+: DP1.2 J6A.5 | length 38.5
  Top Layer w1.2: J6A.5@26.159,117.602 J6A.5
  Bottom Layer w1.2: J6A.5@26.159,117.602 24.638,117.602 23.632,118.608 23.632,122.184 28.868,127.42 43.942,127.42 48.139,123.223 DP1.2
VC1-: DP1.4 J6A.10 | length 29.6
  Bottom Layer w1.2: J6A.10 36.484,116.59 38.354,114.72 46.99,114.72 51.949,119.679 DP1.4
VC2+: DP2.2 J6A.6 | length 15.9
  Bottom Layer w1.2: J6A.6 26.162,121.92 27.852,123.61 32.766,123.61 35.427,120.949 DP2.2
VC2-: DP2.4 J6A.11 | length 17.6
  Bottom Layer w1.2: J6A.11 39.206,118.62 41.535,120.949 DP2.4
VDD: C1.1 C12.1 C14.1 C15.1 DP1.1 DP2.1 DZ1.2 R25.2 RDET2.2 U1.1 U6.1 U8.8 | length 256.1
  Top Layer w0.508: DP1.1 58.078,123.356 58.166,123.444 C15.1 DZ1.2 ; R25.2 77.978,128.524 81.28,125.222 RDET2.2
  Top Layer w1.2: C1.1 12.7,23.622 ; U1.1 14.224,25.146 12.7,23.622 ; C12.1 18.034,12.7 ; U6.1 40.132,7.62 33.782,13.97 19.304,13.97 18.034,12.7 ; DP2.1 42.926,123.356 45.466,123.356 46.99,124.88 ; DP1.1 50.292,124.88 ; C14.1 51.816,126.404 50.292,124.88 ; 6.604,29.718 6.604,50.038 8.89,52.324 8.89,96.52 22.098,109.728 22.098,124.714 24.804,127.42 44.45,127.42 46.99,124.88 ; 6.604,29.718 5.08,28.194 5.08,19.05 10.16,13.97 16.764,13.97 18.034,12.7 ; 6.604,29.718 12.7,23.622 ; 46.99,124.88 50.292,124.88
  Bottom Layer w0.508: DZ1.2 66.802,123.444 67.818,124.46 ; R25.2 67.818,124.46 ; U8.8 68.834,123.444 67.818,124.46
VSS: C15.2 DP1.3 DP2.3 DZ1.1 RCLASS2.1 RILIM.1 U8.4 | length 46.8
  Top Layer w0.508: DP1.3 57.988,116.002 58.166,115.824 C15.2
  Top Layer w1.2: DP2.3 43.764,117.272 46.99,114.046 49.86,114.046 DP1.3
  Bottom Layer w0.508: C15.2 64.148,115.824 ; RILIM.1 RCLASS2.1 DZ1.1 65.278,114.694 64.148,115.824 ; U8.4 74.422,119.634 72.644,117.856 66.18,117.856 64.148,115.824
pads on no net: "SUJECION 1.1" "SUJECION 2.1" "SUJECION 6.1" "SUJECION 12.1" J1.1 J1.2 J2.3 J2.4 J5.6 J6A.3 J6A.4 J6A.7 J6A.12 J6A.PAD J6A.SHIELD J7.2 J7.3 J7.SH1 J7.SH2 JC1.4 JC1.6 JC1.7 JC1.8 JC1.9 JC1.10 JC2.4 JC2.6 JC2.7 JC2.8 JC2.9 JC2.10 JC3.4 JC3.6 JC3.7 JC3.8 JC3.9 JC3.10 JC4.4 JC4.6 JC4.7 JC4.8 JC4.9 JC4.10 JE1.1 JE1.3 JE1.4 JE1.5 JE1.7 JE1.9 JE1.11 JE1.13 JE1.15 JE1.17 JE1.18 JE1.19 JE1.20 JE1.22 JE1.23 JE1.24 JE1.25 JE1.26 JE2.2 JE2.3 JE2.5 JE2.7 JE2.8 JE2.9 JE2.11 JE2.13 JE2.15 JE2.17 JE2.19 JE2.21 JE2.22 JE2.23 JE2.25 JE2.26 JE3.1 JE3.2 JE3.3 JE3.4 JE3.5 JE3.6 JE3.7 JE3.8 JE3.9 JE3.10 JE3.11 JE3.12 JE3.13 JE3.14 JE3.15 JE3.16 JE3.19 JE3.20 JE3.21 JE3.22 JE3.23 JE3.24 JE4.1 JE4.2 JE4.3 JE4.4 JE4.5 JE4.7 JE4.9 JE4.11 JE4.13 JE4.14 JE4.15 JE4.19 JE4.21 JE4.22 L1.NC U8.7

## Polygon pours and split planes (outlines as drawn)
ANALOG_GND_A on Bottom Layer "ANALOG_GND_A_L02_P002" (solid, pour order 2): 78.74,7.366 74.676,11.43 71.882,11.43 71.374,11.938 71.374,25.908 72.898,27.432 72.136,28.194 72.136,30.988 71.628,31.496 68.58,31.496 68.072,30.988 68.072,6.858 69.342,5.588 78.232,5.588 78.74,6.096
ANALOG_GND_A on Bottom Layer "ANALOG_GND_A_L02_P001" (solid, pour order 1): 16.764,7.112 17.272,7.62 20.32,7.62 24.892,3.048 41.148,3.048 41.656,3.556 41.656,7.62 41.402,7.874 38.1,7.874 32.258,13.716 32.258,17.272 32.766,17.78 34.798,17.78 35.306,17.272 35.306,14.986 41.402,8.89 45.974,8.89 50.292,13.208 59.944,13.208 60.452,12.7 60.452,11.176 59.944,10.668 54.61,10.668 52.832,8.89 52.832,4.064 54.102,2.794 54.102,1.778 53.594,1.27 52.07,1.27 40.894,1.27 18.542,1.27 16.764,3.048
ANALOG_GND_A on Bottom Layer "ANALOG_GND_A_L02_P000" (solid, pour order 0): 24.384,27.686 24.384,26.924 23.876,26.416 23.114,26.416 21.844,25.146 21.844,19.558 21.336,19.05 16.256,19.05 15.748,19.558 15.748,21.844 14.478,23.114 14.478,24.13 15.748,25.4 15.748,28.702 15.494,28.956 10.922,28.956 8.89,30.988 8.89,32.766 9.398,33.274 12.192,33.274 15.494,29.972 20.066,29.972 21.59,31.496 21.59,37.338 26.162,41.91 27.686,41.91 28.194,41.402 28.194,37.592 24.384,33.782 24.384,29.591

## Keep-outs
Keep-Out Layer:
  the board outline again, w0.254

## Silkscreen, mask and mechanical layers (free items; w line width, h text height)
Top Overlay:
  drawing of 9 lines, arcs and shapes, not listed
  text "Rev.4" at 87.884,108.966 h1.52
  text "IN4" at 22.276,93.142 h1.04
  text "IN3" at 22.276,88.824 h1.04
  text "IN2" at 22.276,84.76 h1.04
  text "IN1" at 22.276,80.442 h1.04
  text "ANALOG IN" at 3.226,76.378 h1.04
  text "DO4" at 22.276,69.774 h1.04
  text "DO3" at 22.276,65.456 h1.04
  text "DO2" at 22.276,61.138 h1.04
  text "DO1" at 22.276,57.074 h1.04
  text "DIGITAL OUT" at 2.464,52.756 h1.04
  text "+" at 121.158,37.084 h1.52 r90
  text "-" at 126.492,37.084 h1.52 r90
  text "PLC" at 121.844,37.008 h1.04
  text "3V3" at 88.316,32.944 h1.04
  text "-" at 86.614,32.766 h1.52
  text "+" at 91.694,32.766 h1.52
  text "3V3" at 85.776,26.594 h1.04
  text "5V" at 91.364,26.594 h1.04
  text "24V" at 25.578,17.196 h1.04
  text "SW" at 119.558,12.37 h1.04
  text "SW" at 124.892,12.37 h1.04
  text "PEDAL" at 131.496,12.37 h1.04
  text "5V" at 119.812,3.226 h1.04
  text "24V" at 124.384,3.226 h1.04
  text "+" at 117.602,3.048 h1.52
  text "-" at 122.682,3.048 h1.52
  text "+" at 127.762,3.048 h1.52
Mechanical 1:
  the board outline again, w0.254
Mechanical 13:
  lines w0.254: 69.342,70.104 70.866,70.104 ; 70.104,69.342 70.104,70.866

## Text inside footprints (layer, text, board x,y; h text height)
C1: Top Overlay "+" at 12.116,21.565 h1.27
C2: Top Overlay "+" at 32.588,39.395 h1.27 r180
C5: Top Overlay "+" at 73.838,12.548 h1.02 r180
C12: Top Overlay "+" at 19.279,12.014 h1.27 r270
C13: Top Overlay "+" at 64.846,10.693 h1.27 r180
C14: Top Overlay "+" at 50.571,128.194 h1.27 r90
DP1: Top Overlay "+" at 51.316,120.679 h1.52
DP2: Top Overlay "+" at 41.156,121.949 h1.52